# Allegro board 887904-1109-1.brd
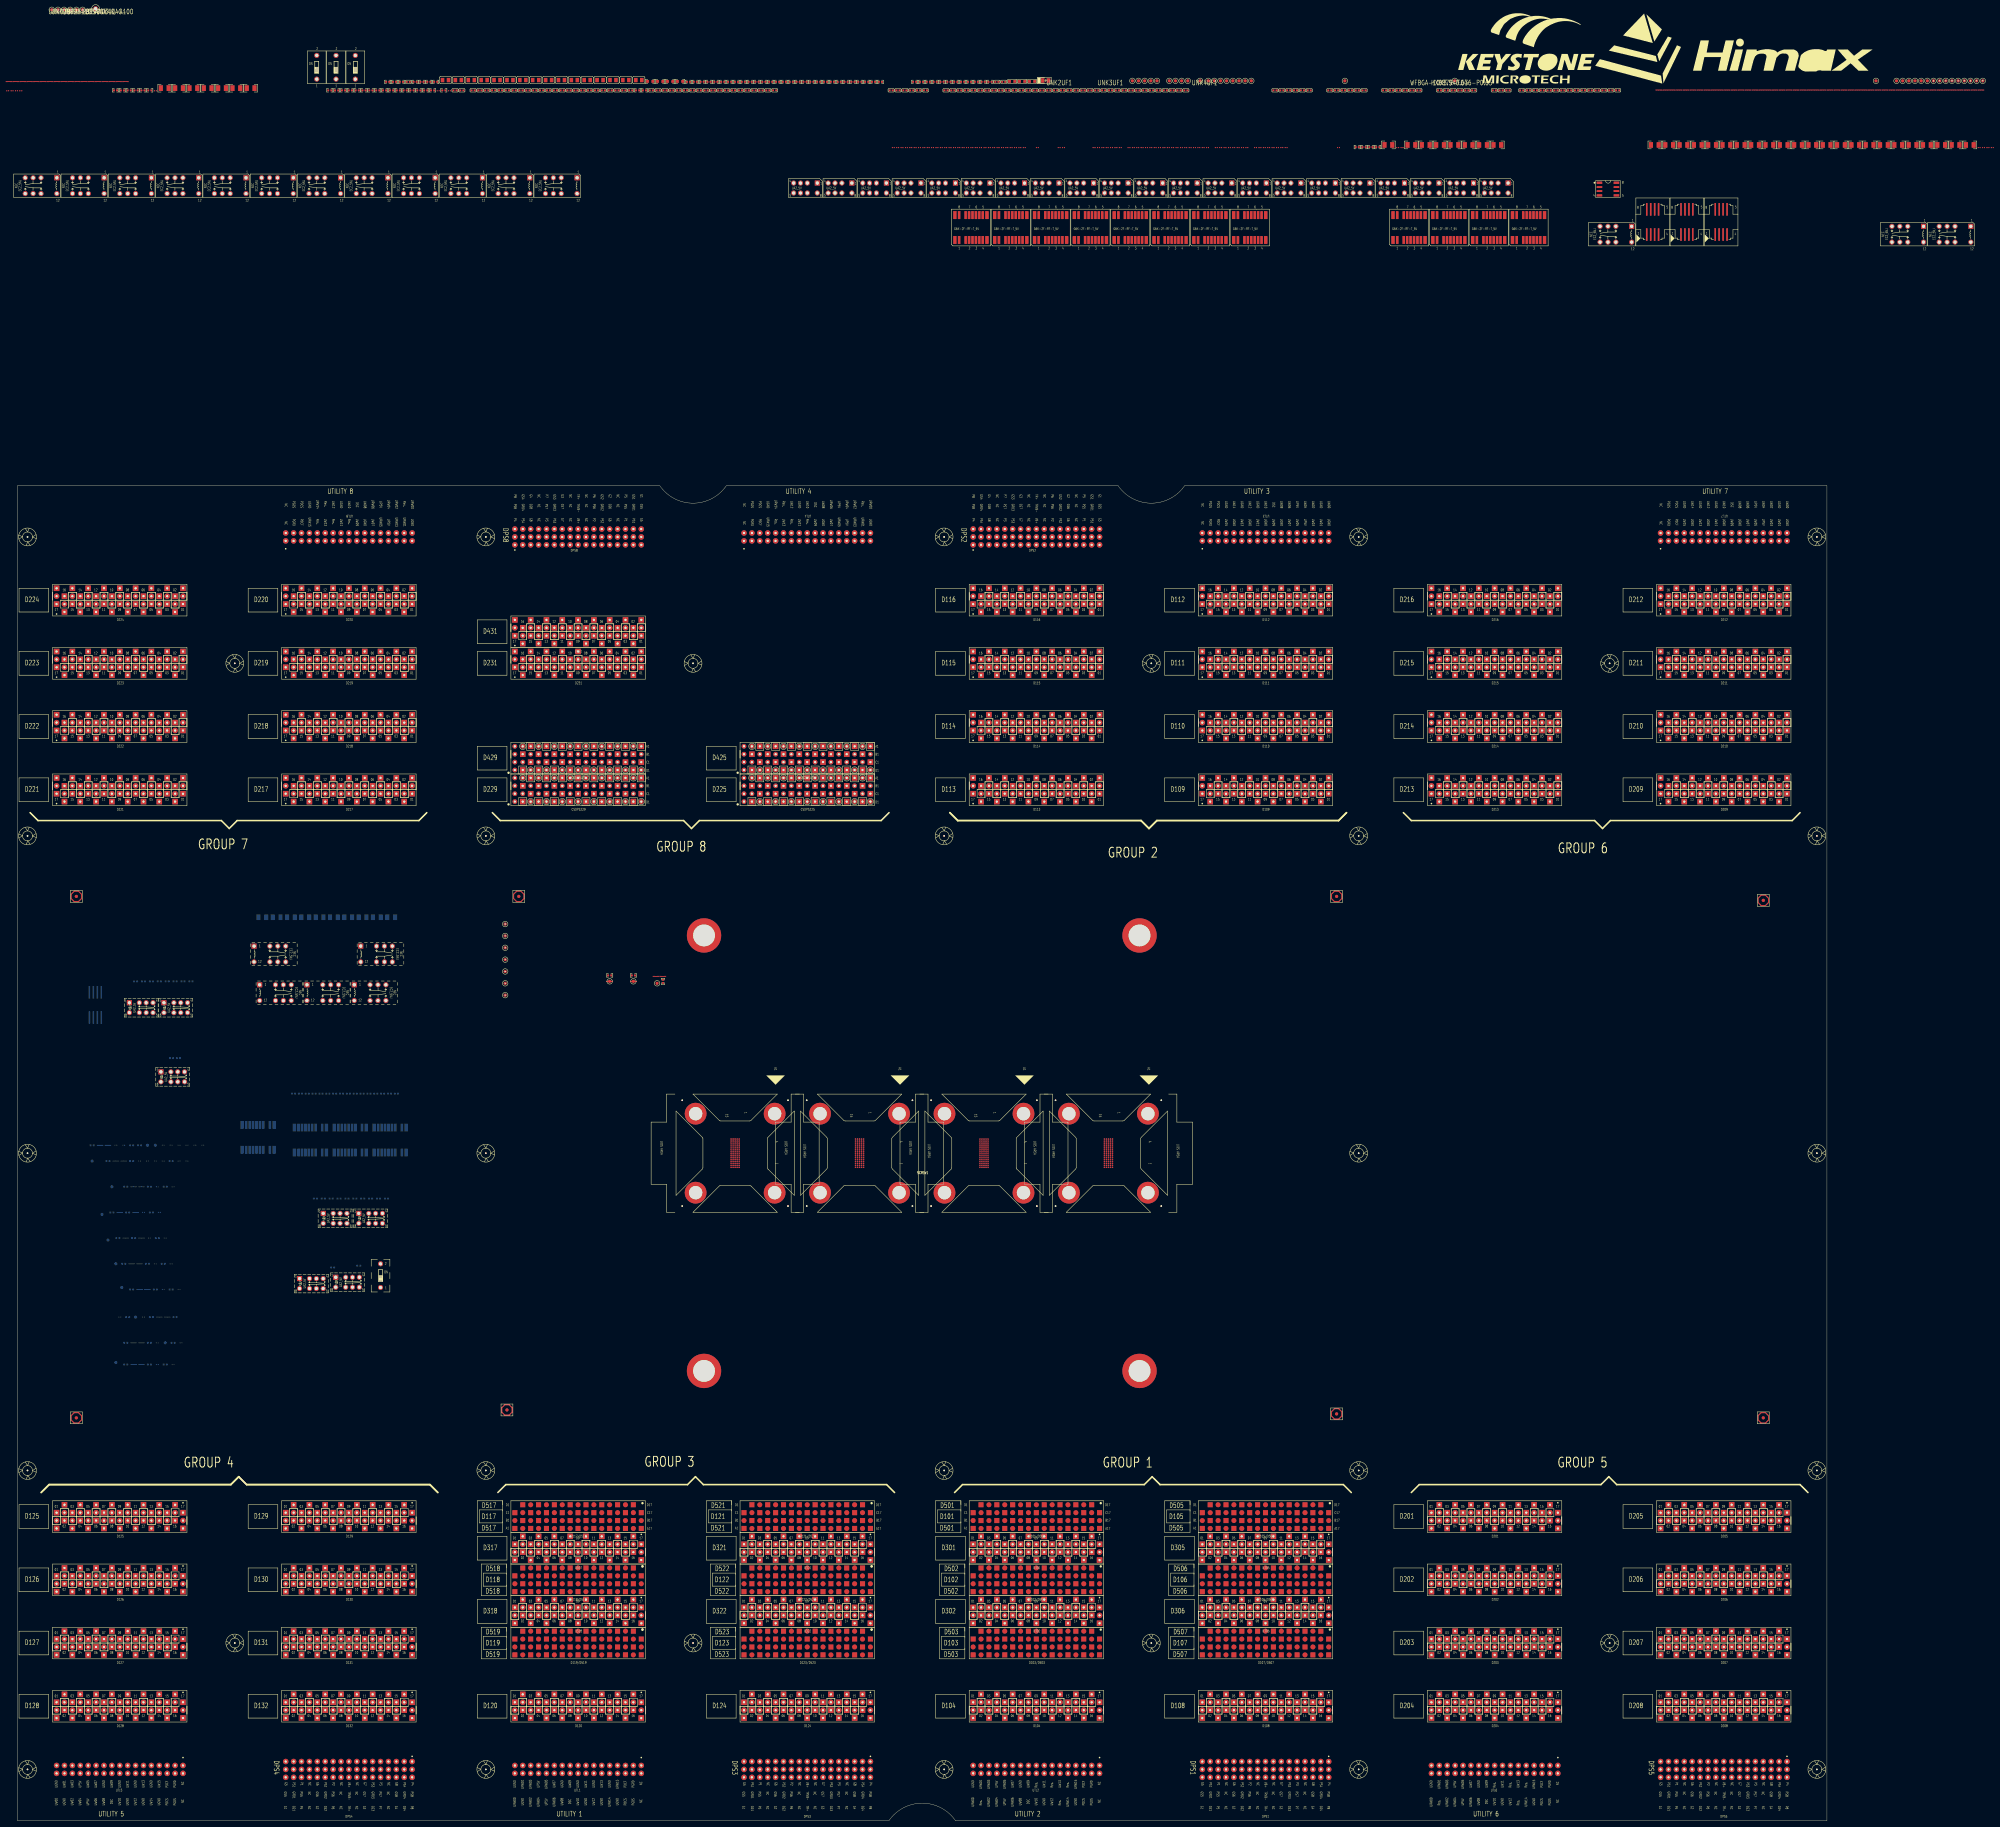
[diagram p0: board, top side]
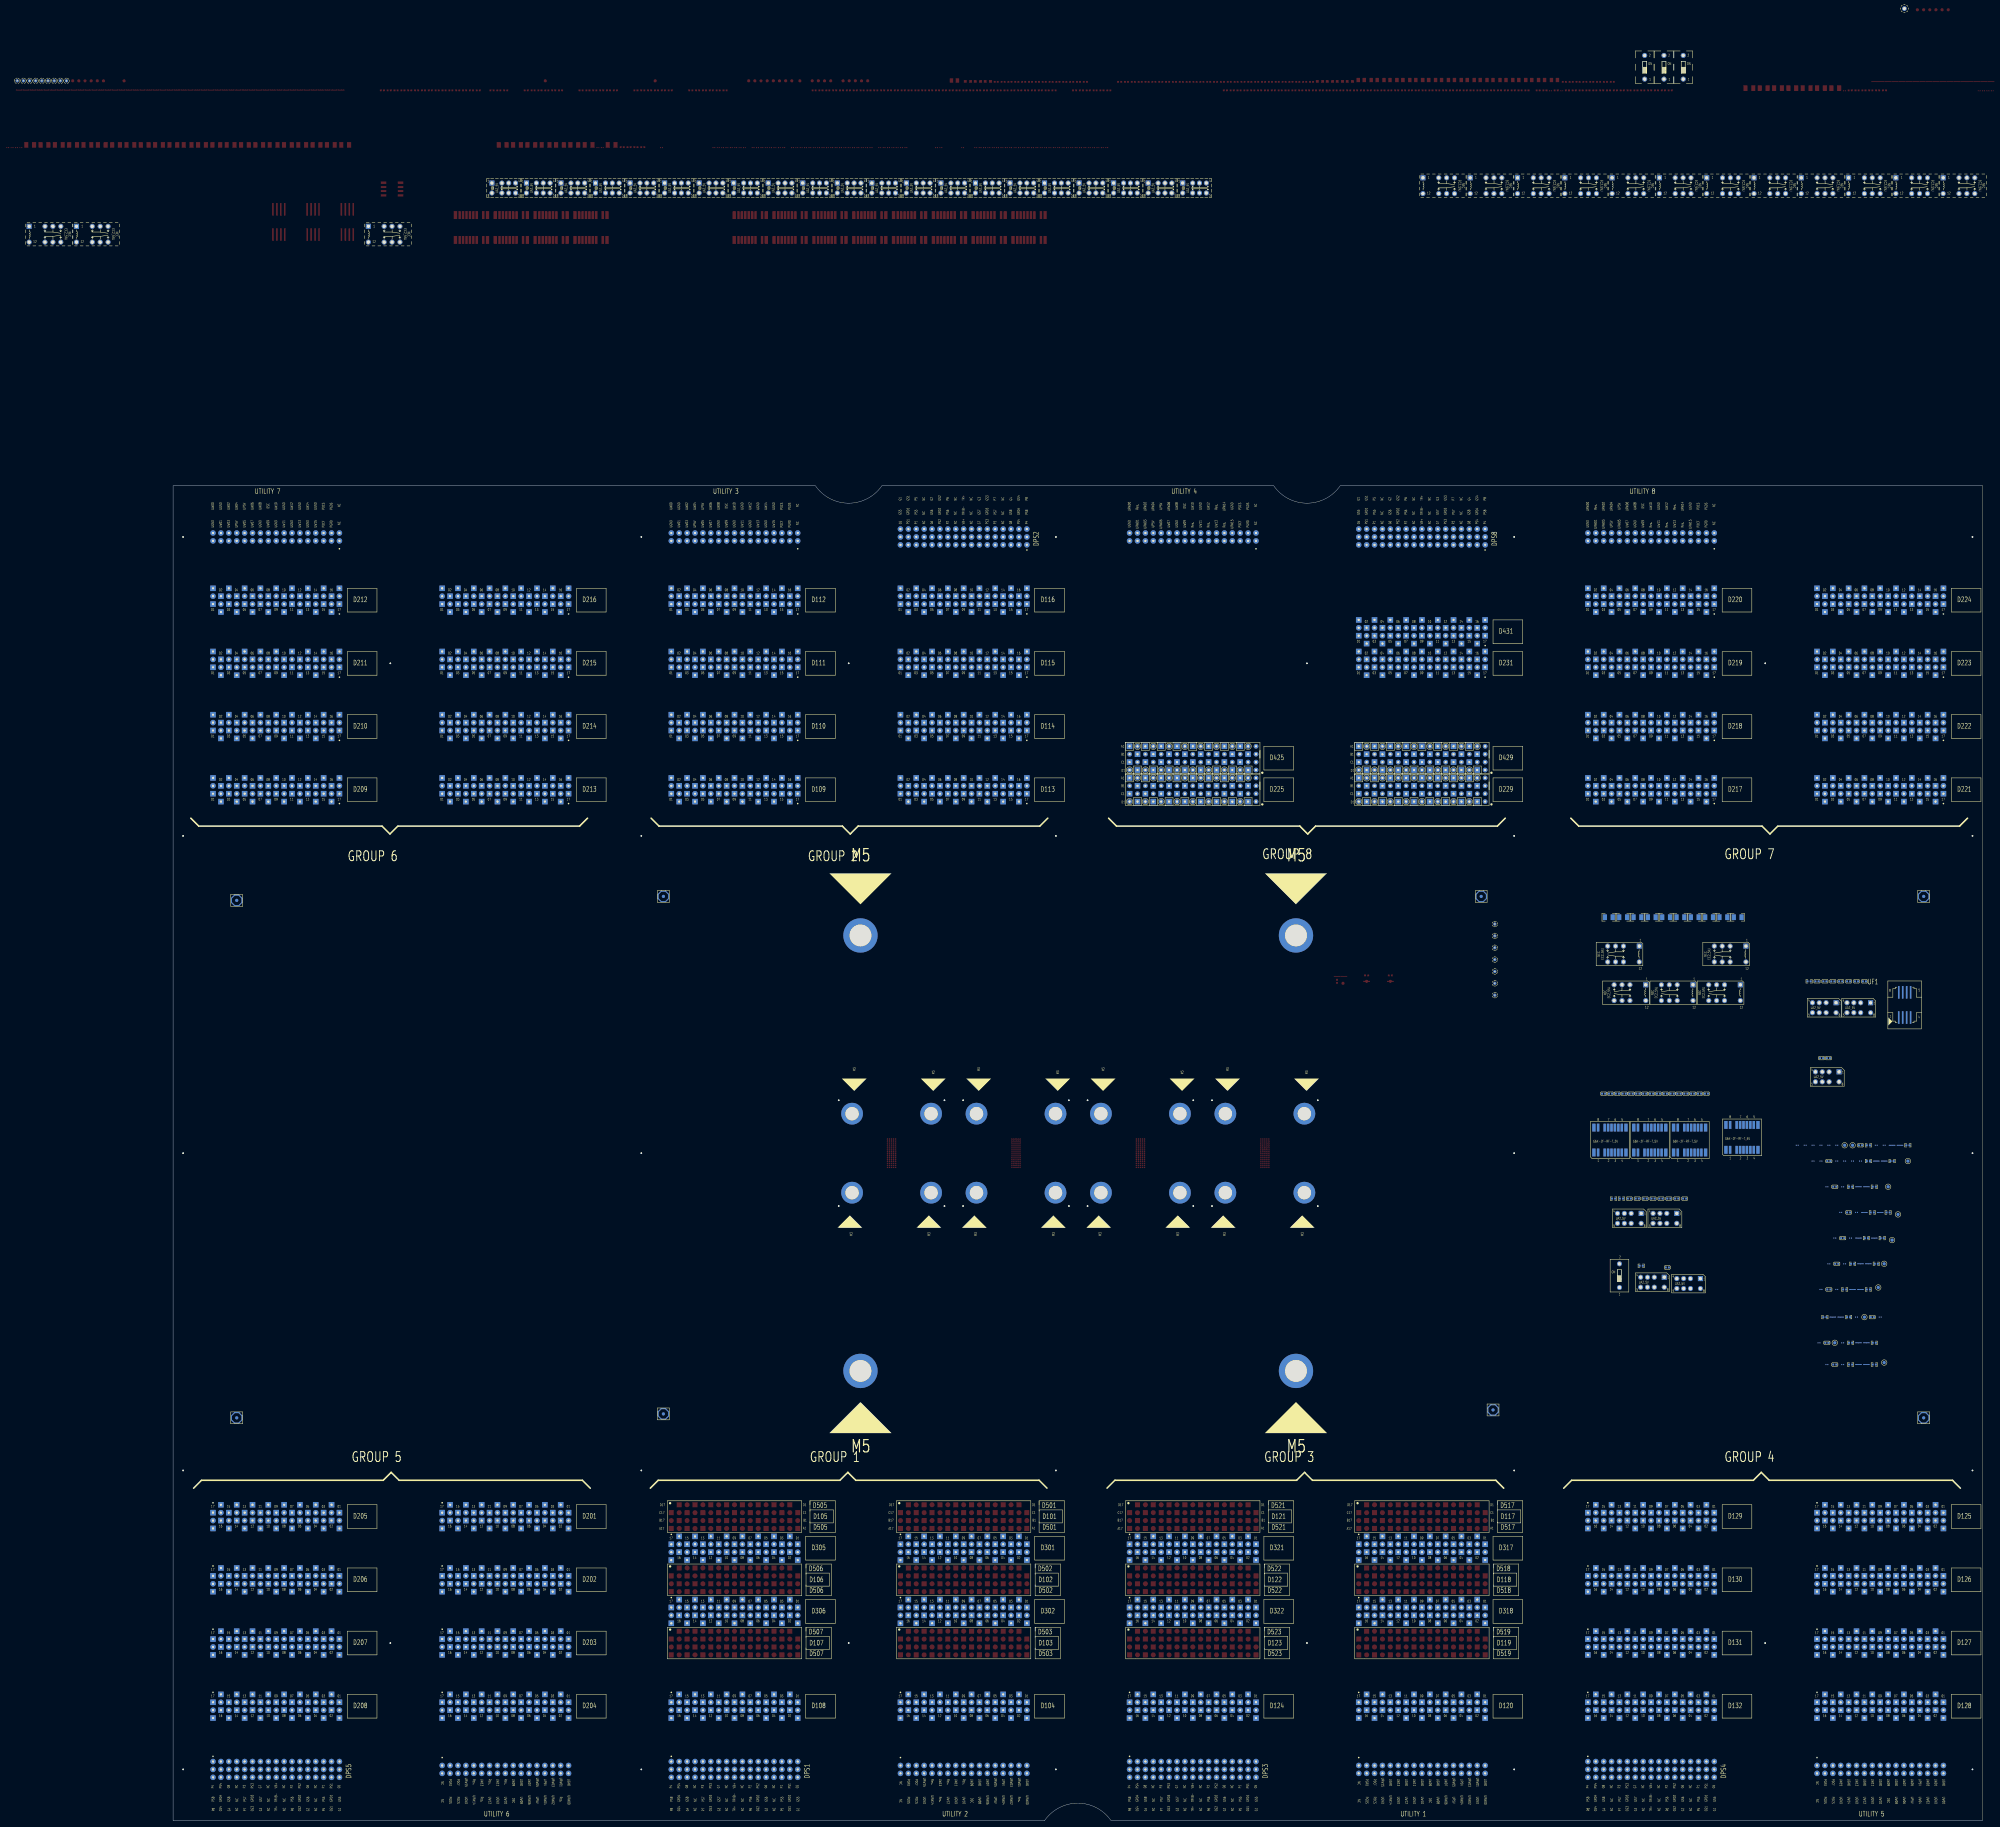
[diagram p1: board, bottom side, seen from below]

Outline 581.66 x 429.26 mm; copper layers: TOP, L02_GND, L03_SIGNAL, L04_GND, L05_SIGNAL, L06_GND, L07_SIGNAL, L08_GND, L09_POWER, L10_GND, L11_POWER, L12_GND, L13_POWER, L14_GND, L15_POWER, L16_GND, L17_POWER, L18_GND, L19_POWER, L20_GND, L21_POWER, L22_GND, L23_POWER, L24_GND, L25_5V, L26_CBIT, L27_GND, L28_SIGNAL, L29_GND, L30_SIGNAL, L31_GND, L32_SIGNAL, L33_GND, BOTTOM. Coordinates in mm from the lower left corner of the outline.

## Placement (name value [footprint] x y rotation side)
BD29  BD120-3A-S8  [FB0805]  137.61 559.64 0 top
BD30  BD120-3A-S8  [FB0805]  141.75 559.64 0 top
BD31  BD120-3A-S8  [FB0805]  145.89 559.64 0 top
BD32  BD120-3A-S8  [FB0805]  150.03 559.64 0 top
BD33  BD120-3A-S8  [FB0805]  154.17 559.64 0 top
BD34  BD120-3A-S8  [FB0805]  158.31 559.64 0 top
BD35  BD120-3A-S8  [FB0805]  162.45 559.64 0 top
BD36  BD120-3A-S8  [FB0805]  166.59 559.64 0 top
BD37  BD120-3A-S8  [FB0805]  170.73 559.64 0 top
BD38  BD120-3A-S8  [FB0805]  174.87 559.64 0 top
BD39  BD120-3A-S8  [FB0805]  179.01 559.64 0 top
BD40  BD120-3A-S8  [FB0805]  183.15 559.64 0 top
BD41  BD120-3A-S8  [FB0805]  187.29 559.64 0 top
BD42  BD120-3A-S8  [FB0805]  191.43 559.64 0 top
BD43  BD120-3A-S8  [FB0805]  195.57 559.64 0 top
BD44  BD120-3A-S8  [FB0805]  199.71 559.64 0 top
C1  0.1U-16-X-S4-MU  [C0402]  55.75 269.88 180 bottom
C53  0.1U-16-X-S4-MU  [C0402]  116.07 200.03 180 bottom
C54  0.1U-16-X-S4-MU  [C0402]  118.61 200.03 180 bottom
C55  0.1U-16-X-S4-MU  [C0402]  109.72 178.44 180 bottom
C67  1U-10-X-S4-MU  [C0402]  36.7 217.17 180 bottom
C69  10U-25-X7R-SA  [C1206]  78.7 290.49 180 bottom
C70  10U-25-X7R-SA  [C1206]  83.3 290.49 180 bottom
C71  1U-10-X-S4-MU  [C0402]  36.7 212.09 180 bottom
C73  1U-10-X-S4-MU  [C0402]  42.41 203.84 180 bottom
C75  1U-10-X-S4-MU  [C0402]  35.43 195.58 180 bottom
C77  1U-10-X-S4-MU  [C0402]  37.33 187.32 180 bottom
C79  1U-10-X-S4-MU  [C0402]  41.78 179.07 180 bottom
C81  1U-10-X-S4-MU  [C0402]  44.32 170.81 180 bottom
C83  1U-10-X-S4-MU  [C0402]  43.05 161.93 180 bottom
C85  1U-10-X-S4-MU  [C0402]  42.41 153.67 180 bottom
C87  1U-10-X-S4-MU  [C0402]  42.41 146.69 180 bottom
C89  10U-25-X7R-SA  [C1206]  87.91 290.49 180 bottom
C90  10U-25-X7R-SA  [C1206]  92.51 290.49 180 bottom
C91  10U-25-X7R-SA  [C1206]  97.11 290.49 180 bottom
C92  10U-25-X7R-SA  [C1206]  101.72 290.49 180 bottom
C93  10U-25-X7R-SA  [C1206]  106.32 290.49 180 bottom
C94  10U-25-X7R-SA  [C1206]  110.92 290.49 180 bottom
C95  10U-25-X7R-SA  [C1206]  115.53 290.49 180 bottom
C96  10U-25-X7R-SA  [C1206]  120.13 290.49 180 bottom
CA1  NC/2.2U-10-X-S4-MU  [C0402]  24 217.17 180 bottom
CA2  NC/2.2U-10-X-S4-MU  [C0402]  29.08 212.09 180 bottom
CA3  NC/2.2U-10-X-S4-MU  [C0402]  34.79 203.84 180 bottom
CA4  NC/2.2U-10-X-S4-MU  [C0402]  30.35 195.58 180 bottom
CA5  NC/2.2U-10-X-S4-MU  [C0402]  32.25 187.32 180 bottom
CA6  NC/2.2U-10-X-S4-MU  [C0402]  34.16 179.07 180 bottom
CA7  NC/2.2U-10-X-S4-MU  [C0402]  36.7 170.81 180 bottom
CA8  NC/2.2U-10-X-S4-MU  [C0402]  50.67 161.93 180 bottom
CA9  NC/2.2U-10-X-S4-MU  [C0402]  34.79 153.67 180 bottom
CA10  NC/2.2U-10-X-S4-MU  [C0402]  34.79 146.69 180 bottom
CA12  NC/2.2U-10-X-S4-MU  [C0402]  207.51 269.88 90 top
CA13  NC/2.2U-10-X-S4-MU  [C0402]  190.37 271.78 0 top
CA14  NC/2.2U-10-X-S4-MU  [C0402]  197.99 271.78 0 top
CB1  0.1U-16-X-S4-MU  [C0402]  277.38 559.05 0 top
CB2  10U-25-X7R-SA  [C1206]  457.3 538.78 0 top
CB3  0.1U-16-X-S4-MU  [C0402]  272.98 559.05 0 top
CB4  10U-25-X7R-SA  [C1206]  452.7 538.78 0 top
CB5  0.1U-16-X-S4-MU  [C0402]  270.77 559.05 0 top
CB6  10U-25-X7R-SA  [C1206]  448.09 538.78 0 top
CB7  0.1U-16-X-S4-MU  [C0402]  268.57 559.05 0 top
CB8  10U-25-X7R-SA  [C1206]  440.68 538.78 0 top
CB9  0.1U-25-X-S6  [C0603]  212.99 559.2 0 top
CB10  10U-25-X7R-SA  [C1206]  475.71 538.78 0 top
CB11  0.1U-25-X-S6  [C0603]  203.38 559.2 0 top
CB12  10U-25-X7R-SA  [C1206]  471.11 538.78 0 top
CB13  0.1U-25-X-S6  [C0603]  206.58 559.2 0 top
CB14  10U-25-X7R-SA  [C1206]  466.5 538.78 0 top
CB15  0.1U-25-X-S6  [C0603]  209.79 559.2 0 top
CB16  10U-25-X7R-SA  [C1206]  461.9 538.78 0 top
CB19  0.1U-16-X-S4-MU  [C0402]  275.18 559.05 0 top
CC1  0.47U-10-X6S-S2-TY  [C0201]  31.62 217.17 180 bottom
CC2  0.47U-10-X6S-S2-TY  [C0201]  46.86 217.17 180 bottom
CC3  0.47U-10-X6S-S2-TY  [C0201]  49.4 217.17 180 bottom
CC4  0.47U-10-X6S-S2-TY  [C0201]  34.16 217.17 180 bottom
CC5  0.47U-10-X6S-S2-TY  [C0201]  46.86 212.09 180 bottom
CC6  0.47U-10-X6S-S2-TY  [C0201]  41.78 212.09 180 bottom
CC7  0.47U-10-X6S-S2-TY  [C0201]  44.32 212.09 180 bottom
CC8  0.47U-10-X6S-S2-TY  [C0201]  44.95 203.84 180 bottom
CC9  0.47U-10-X6S-S2-TY  [C0201]  40.51 195.58 180 bottom
CC10  0.47U-10-X6S-S2-TY  [C0201]  42.41 187.32 180 bottom
CC11  0.47U-10-X6S-S2-TY  [C0201]  44.32 179.07 180 bottom
CC12  0.47U-10-X6S-S2-TY  [C0201]  46.86 170.81 180 bottom
CC13  0.47U-10-X6S-S2-TY  [C0201]  40.51 161.93 180 bottom
CC14  0.47U-10-X6S-S2-TY  [C0201]  44.95 153.67 180 bottom
CC15  0.47U-10-X6S-S2-TY  [C0201]  44.95 146.69 180 bottom
CD1  0.1U-10-X7R-S2-MU  [C0201]  51.94 217.17 180 bottom
CD2  0.1U-10-X7R-S2-MU  [C0201]  54.48 217.17 180 bottom
CD3  0.1U-10-X7R-S2-MU  [C0201]  57.02 217.17 180 bottom
CD4  0.1U-10-X7R-S2-MU  [C0201]  59.56 217.17 180 bottom
CD5  0.1U-10-X7R-S2-MU  [C0201]  51.94 212.09 180 bottom
CD6  0.1U-10-X7R-S2-MU  [C0201]  39.24 212.09 180 bottom
CD7  0.1U-10-X7R-S2-MU  [C0201]  54.48 212.09 180 bottom
CD8  0.1U-10-X7R-S2-MU  [C0201]  50.03 203.84 180 bottom
CD9  0.1U-10-X7R-S2-MU  [C0201]  45.59 195.58 180 bottom
CD10  0.1U-10-X7R-S2-MU  [C0201]  47.49 187.32 180 bottom
CD11  0.1U-10-X7R-S2-MU  [C0201]  49.4 179.07 180 bottom
CD12  0.1U-10-X7R-S2-MU  [C0201]  51.94 170.81 180 bottom
CD13  0.1U-10-X7R-S2-MU  [C0201]  32.89 161.93 180 bottom
CD14  0.1U-10-X7R-S2-MU  [C0201]  52.57 153.67 180 bottom
CD15  0.1U-10-X7R-S2-MU  [C0201]  50.03 146.69 180 bottom
CSDPS225  V93K_CSDPS_DPS32  [PG_VG93K_PF_DPS32_G8D225]  253.87 331.47 0 top
CSDPS229  V93K_CSDPS_DPS32  [PG_VG93K_PF_DPS32_G8D229]  180.21 331.47 0 top
CSDPS425  V93K_CSDPS_DPS32  [PG_VG93K_PF_DPS32_G8D425]  253.87 341.63 0 top
CSDPS429  V93K_CSDPS_DPS32  [PG_VG93K_PF_DPS32_G8D429]  180.21 341.63 0 top
D101/D501  V93K_PS1600 HD  [PG_VG93K_F_HSM_G1D101_501_ND]  327.53 97.79 0 top
D102/D502  V93K_PS1600 HD  [PG_VG93K_F_HSM_G1D102_502_ND]  327.53 77.47 0 top
D103/D503  V93K_PS1600 HD  [PG_VG93K_F_HSM_G1D103_503_ND]  327.53 57.15 0 top
D104  V93K_CH  [PG_VG93K_F_G1D104]  327.53 36.83 0 top
D105/D505  V93K_PS1600 HD  [PG_VG93K_F_HSM_G1D105_505_ND]  401.19 97.79 0 top
D106/D506  V93K_PS1600 HD  [PG_VG93K_F_HSM_G1D106_506_ND]  401.19 77.47 0 top
D107/D507  V93K_PS1600 HD  [PG_VG93K_F_HSM_G1D107_507_ND]  401.19 57.15 0 top
D108  V93K_CH  [PG_VG93K_F_G1D108]  401.19 36.83 0 top
D109  V93K_CH  [PG_VG93K_F_G2D109]  401.19 331.47 0 top
D110  V93K_CH  [PG_VG93K_F_G2D110]  401.19 351.79 0 top
D111  V93K_CH  [PG_VG93K_F_G2D111]  401.19 372.11 0 top
D112  V93K_CH  [PG_VG93K_F_G2D112]  401.19 392.43 0 top
D113  V93K_CH  [PG_VG93K_F_G2D113]  327.53 331.47 0 top
D114  V93K_CH  [PG_VG93K_F_G2D114]  327.53 351.79 0 top
D115  V93K_CH  [PG_VG93K_F_G2D115]  327.53 372.11 0 top
D116  V93K_CH  [PG_VG93K_F_G2D116]  327.53 392.43 0 top
D117/D517  V93K_PS1600 HD  [PG_VG93K_F_HSM_G3D117_517_ND]  180.21 97.79 0 top
D118/D518  V93K_PS1600 HD  [PG_VG93K_F_HSM_G3D118_518_ND]  180.21 77.47 0 top
D119/D519  V93K_PS1600 HD  [PG_VG93K_F_HSM_G3D119_519_ND]  180.21 57.15 0 top
D120  V93K_CH  [PG_VG93K_F_G3D120]  180.21 36.83 0 top
D121/D521  V93K_PS1600 HD  [PG_VG93K_F_HSM_G3D121_521_ND]  253.87 97.79 0 top
D122/D522  V93K_PS1600 HD  [PG_VG93K_F_HSM_G3D122_522_ND]  253.87 77.47 0 top
D123/D523  V93K_PS1600 HD  [PG_VG93K_F_HSM_G3D123_523_ND]  253.87 57.15 0 top
D124  V93K_CH  [PG_VG93K_F_G3D124]  253.87 36.83 0 top
D125  V93K_CH  [PG_VG93K_F_G4D125]  32.89 97.79 0 top
D126  V93K_CH  [PG_VG93K_F_G4D126]  32.89 77.47 0 top
D127  V93K_CH  [PG_VG93K_F_G4D127]  32.89 57.15 0 top
D128  V93K_CH  [PG_VG93K_F_G4D128]  32.89 36.83 0 top
D129  V93K_CH  [PG_VG93K_F_G4D129]  106.55 97.79 0 top
D130  V93K_CH  [PG_VG93K_F_G4D130]  106.55 77.47 0 top
D131  V93K_CH  [PG_VG93K_F_G4D131]  106.55 57.15 0 top
D132  V93K_CH  [PG_VG93K_F_G4D132]  106.55 36.83 0 top
D201  V93K_CH  [PG_VG93K_F_G5D201]  474.85 97.79 0 top
D202  V93K_CH  [PG_VG93K_F_G5D202]  474.85 77.47 0 top
D203  V93K_CH  [PG_VG93K_F_G5D203]  474.85 57.15 0 top
D204  V93K_CH  [PG_VG93K_F_G5D204]  474.85 36.83 0 top
D205  V93K_CH  [PG_VG93K_F_G5D205]  548.51 97.79 0 top
D206  V93K_CH  [PG_VG93K_F_G5D206]  548.51 77.47 0 top
D207  V93K_CH  [PG_VG93K_F_G5D207]  548.51 57.15 0 top
D208  V93K_CH  [PG_VG93K_F_G5D208]  548.51 36.83 0 top
D209  V93K_CH  [PG_VG93K_F_G6D209]  548.51 331.47 0 top
D210  V93K_CH  [PG_VG93K_F_G6D210]  548.51 351.79 0 top
D211  V93K_CH  [PG_VG93K_F_G6D211]  548.51 372.11 0 top
D212  V93K_CH  [PG_VG93K_F_G6D212]  548.51 392.43 0 top
D213  V93K_CH  [PG_VG93K_F_G6D213]  474.85 331.47 0 top
D214  V93K_CH  [PG_VG93K_F_G6D214]  474.85 351.79 0 top
D215  V93K_CH  [PG_VG93K_F_G6D215]  474.85 372.11 0 top
D216  V93K_CH  [PG_VG93K_F_G6D216]  474.85 392.43 0 top
D217  V93K_CH  [PG_VG93K_F_G7D217]  106.55 331.47 0 top
D218  V93K_CH  [PG_VG93K_F_G7D218]  106.55 351.79 0 top
D219  V93K_CH  [PG_VG93K_F_G7D219]  106.55 372.11 0 top
D220  V93K_CH  [PG_VG93K_F_G7D220]  106.55 392.43 0 top
D221  V93K_CH  [PG_VG93K_F_G7D221]  32.89 331.47 0 top
D222  V93K_CH  [PG_VG93K_F_G7D222]  32.89 351.79 0 top
D223  V93K_CH  [PG_VG93K_F_G7D223]  32.89 372.11 0 top
D224  V93K_CH  [PG_VG93K_F_G7D224]  32.89 392.43 0 top
D231  V93K_CH  [PG_VG93K_F_G8D231]  180.21 372.11 0 top
D301  V93K_CH  [PG_VG93K_F_G1D301]  327.53 87.63 0 top
D302  V93K_CH  [PG_VG93K_F_G1D302]  327.53 67.31 0 top
D305  V93K_CH  [PG_VG93K_F_G1D305]  401.19 87.63 0 top
D306  V93K_CH  [PG_VG93K_F_G1D306]  401.19 67.31 0 top
D317  V93K_CH  [PG_VG93K_F_G3D317]  180.21 87.63 0 top
D318  V93K_CH  [PG_VG93K_F_G3D318]  180.21 67.31 0 top
D321  V93K_CH  [PG_VG93K_F_G3D321]  253.87 87.63 0 top
D322  V93K_CH  [PG_VG93K_F_G3D322]  253.87 67.31 0 top
D431  V93K_CH  [PG_VG93K_F_G8D431]  180.21 382.27 0 top
DPS1  V93K_DPS  [PG_VG93K_F_G1DPS1]  401.19 16.51 0 top
DPS2  V93K_DPS  [PG_VG93K_F_G2DPS2]  327.53 412.75 0 top
DPS3  V93K_DPS  [PG_VG93K_F_G3DPS3]  253.87 16.51 0 top
DPS4  V93K_DPS  [PG_VG93K_F_G4DPS4]  106.55 16.51 0 top
DPS5  V93K_DPS  [PG_VG93K_F_G5DPS5]  548.51 16.51 0 top
DPS8  V93K_DPS  [PG_VG93K_F_G8DPS8]  180.21 412.75 0 top
FD1  -  [FD_040_V2]  157.35 132.08 0 top
FD2  -  [FD_040_V2]  424.05 130.81 0 top
FD3  -  [FD_040_V2]  424.05 297.18 0 top
FD4  -  [FD_040_V2]  161.16 297.18 0 top
FD5  -  [FD_040_V2]  18.92 129.54 0 top
FD6  -  [FD_040_V2]  561.21 129.54 0 top
FD7  -  [FD_040_V2]  561.21 295.91 0 top
FD8  -  [FD_040_V2]  18.92 297.18 0 top
FD9  -  [FD_040_V2]  157.35 132.08 180 bottom
FD10  -  [FD_040_V2]  424.05 130.81 180 bottom
FD11  -  [FD_040_V2]  424.05 297.18 180 bottom
FD12  -  [FD_040_V2]  161.16 297.18 180 bottom
FD13  -  [FD_040_V2]  18.92 129.54 180 bottom
FD14  -  [FD_040_V2]  561.21 129.54 180 bottom
FD15  -  [FD_040_V2]  561.21 295.91 180 bottom
FD16  -  [FD_040_V2]  18.92 297.18 180 bottom
GND1  TP01  [TP_040_T]  41.78 217.17 180 bottom
HX8879-F04  REF-CODE-CHIP  [CHIP_CODE]  460.09 558.9 0 top
K9  UA2-5NJ-A-V3  [RL_NECUA2_5V_V3]  113.33 193.68 180 bottom
K10  UA2-5NJ-A-V3  [RL_NECUA2_5V_V3]  94.28 172.72 180 bottom
K14  UA2-5NJ-A-V3  [RL_NECUA2_5V_V3]  39.57 261.4 180 bottom
K15  UA2-5NJ-A-V3  [RL_NECUA2_5V_V3]  50.68 261.4 180 bottom
K28  UA2-5NJ-A-V3  [RL_NECUA2_5V_V3]  49.72 239.18 180 bottom
K48  UA2-5NJ-A-V3  [RL_NECUA2_5V_V3]  105.9 173.14 180 bottom
K50  UA2-5NJ-A-V3  [RL_NECUA2_5V_V3]  101.9 193.68 180 bottom
K54  G6K-2F-RF-T-5V-SPECIAL  [RL_G6K2FRT_8P_5V_GR]  77.39 219.71 180 bottom
K55  EC2-5NJ-A  [RL_NECEC2_10P_5V]  84.21 266.23 180 bottom
K56  EC2-5NJ-A  [RL_NECEC2_10P_5V]  99.41 266.23 180 bottom
K57  EC2-5NJ-A  [RL_NECEC2_10P_5V]  114.61 266.23 180 bottom
K58  EC2-5NJ-A  [RL_NECEC2_10P_5V]  82.41 278.66 180 bottom
K59  EC2-5NJ-A  [RL_NECEC2_10P_5V]  116.69 278.66 180 bottom
K60  G6K-2F-RF-T-5V-SPECIAL  [RL_G6K2FRT_8P_5V_GR]  119.82 218.85 180 bottom
K61  G6K-2F-RF-T-5V-SPECIAL  [RL_G6K2FRT_8P_5V_GR]  107.01 218.85 180 bottom
K62  G6K-2F-RF-T-5V-SPECIAL  [RL_G6K2FRT_8P_5V_GR]  94.21 218.85 180 bottom
LDB1  LDB-2-S8  [LED_0805]  330.49 559.5 0 top
LOGO1  -  [LOGO_KT_KSMT]  481.96 562.84 0 top
LOGO2  LOGO_HX_Himax  [LOGO_HX_HIMAX]  550.3 564.49 0 top
LRB1  330-1-S6  [R0603]  319.75 559.2 0 top
NOREF  -  []  102.24 215.4 90 top
NOREF#2  -  []  342.73 526.53 0 top
NOREF#3  -  []  282.82 526.53 0 top
NOREF#4  -  []  48.8 179.39 0 top
NOREF#5  -  []  43.72 178.75 90 top
NOREF#6  -  []  475.97 526.53 0 top
NOREF#7  -  []  48.88 263 0 top
NOREF#8  -  []  44.65 146.69 0 top
NOREF#9  -  []  375.25 537.94 0 top
NOREF#10  -  []  46.26 170.49 90 top
NOREF#11  -  []  438.26 526.53 0 top
NOREF#12  -  []  298 227.33 0 top
NOREF#13  -  []  247.7 197.63 90 top
NOREF#14  -  []  343.2 516.22 0 top
NOREF#15  -  []  293.7 231.63 0 top
NOREF#16  -  []  394.89 537.94 0 top
NOREF#17  -  []  449.36 526.53 0 top
NOREF#18  -  []  138.55 556.2 0 top
NOREF#19  -  []  111.11 214.9 90 top
NOREF#20  -  []  386.17 538.26 0 top
NOREF#21  -  []  46.26 211.77 90 top
NOREF#22  -  []  251.7 233.63 0 top
NOREF#23  -  []  114.17 216.12 90 top
NOREF#24  -  []  279.31 526.53 0 top
NOREF#25  -  []  318.62 537.62 90 top
NOREF#26  -  []  59.26 217.17 0 top
NOREF#27  -  []  25.65 266.34 0 top
NOREF#28  -  []  53.72 240.78 0 top
NOREF#29  -  []  260.61 526.53 0 top
NOREF#30  -  []  301.52 526.53 0 top
NOREF#31  -  []  106.3 174.74 0 top
NOREF#32  -  []  56.72 217.17 0 top
NOREF#33  -  []  44.47 236.18 90 top
NOREF#34  -  []  52.27 153.67 0 top
NOREF#35  -  []  44.35 153.35 90 top
NOREF#36  -  []  42.11 187.32 0 top
NOREF#37  -  []  542.05 511.52 90 top
NOREF#38  -  []  404.95 526.53 0 top
NOREF#39  -  []  43.73 556.52 0 top
NOREF#40  -  []  465.71 507.77 90 top
NOREF#41  -  []  380.36 537.62 90 top
NOREF#42  -  []  106.46 214.85 0 top
NOREF#43  -  []  367.73 537.62 90 top
NOREF#44  -  []  351.64 526.53 0 top
NOREF#45  -  []  403.3 527.93 0 top
NOREF#46  -  []  340.7 217.09 90 top
NOREF#47  -  []  307 508.22 0 top
NOREF#48  -  []  523.74 509.97 90 top
NOREF#49  -  []  481.94 516.22 0 top
NOREF#50  -  []  371.94 537.62 90 top
NOREF#51  -  []  466.64 518.12 0 top
NOREF#52  -  []  460.47 526.53 0 top
NOREF#53  -  []  634.22 538.26 0 top
NOREF#54  -  []  387.58 538.26 0 top
NOREF#55  -  []  323.04 538.26 0 top
NOREF#56  -  []  369.79 521.93 90 top
NOREF#57  -  []  376.35 538.26 0 top
NOREF#58  -  []  51.64 170.81 0 top
NOREF#59  -  []  75.74 223.71 0 top
NOREF#60  -  []  301.35 508.22 0 top
NOREF#61  -  []  379.24 523.33 90 top
NOREF#62  -  []  350.89 537.62 90 top
NOREF#63  -  []  89.01 222.85 0 top
NOREF#64  -  []  54.18 217.17 0 top
NOREF#65  -  []  119.27 214.85 0 top
NOREF#66  -  []  103.16 222.85 0 top
NOREF#67  -  []  -2.04 556.2 0 top
NOREF#68  -  []  289.16 537.62 90 top
NOREF#69  -  []  49.73 146.69 0 top
NOREF#70  -  []  71.04 225.61 0 top
NOREF#71  -  []  458.43 516.22 0 top
NOREF#72  -  []  374.75 537.62 90 top
NOREF#73  -  []  348.59 537.94 0 top
NOREF#74  -  []  553.06 511.52 90 top
NOREF#75  -  []  311.14 196.91 90 top
NOREF#76  -  []  328.44 537.62 90 top
NOREF#77  -  []  293.87 537.94 0 top
NOREF#78  -  []  352.8 537.94 0 top
NOREF#79  -  []  339.21 509.49 90 top
NOREF#80  -  []  91.46 214.85 0 top
NOREF#81  -  []  447.51 521.93 90 top
NOREF#82  -  []  361.22 537.94 0 top
NOREF#83  -  []  38.64 211.77 90 top
NOREF#84  -  []  379.46 537.94 0 top
NOREF#85  -  []  107.56 222.85 0 top
NOREF#86  -  []  33.56 217.49 0 top
NOREF#87  -  []  393.49 537.94 0 top
NOREF#88  -  []  243.7 204.63 90 top
NOREF#89  -  []  345.93 526.53 0 top
NOREF#90  -  []  331.63 526.53 0 top
NOREF#91  -  []  327.23 526.53 0 top
NOREF#92  -  []  444.49 538.26 0 top
NOREF#93  -  []  380.89 521.93 90 top
NOREF#94  -  []  280.96 521.93 90 top
NOREF#95  -  []  390.97 508.22 0 top
NOREF#96  -  []  287.96 538.26 0 top
NOREF#97  -  []  404.21 537.62 90 top
NOREF#98  -  []  352 218.53 90 top
NOREF#99  -  []  418.26 526.53 0 top
NOREF#100  -  []  464.87 526.53 0 top
NOREF#101  -  []  327.86 560.5 0 top
NOREF#102  -  []  336.68 527.93 0 top
NOREF#103  -  []  452.48 508.22 90 top
NOREF#104  -  []  458.82 527.93 0 top
NOREF#105  -  []  401.27 508.22 90 top
NOREF#106  -  []  451.38 508.27 90 top
NOREF#107  -  []  366.53 538.26 0 top
NOREF#108  -  []  290.42 523.33 90 top
NOREF#109  -  []  332.7 195.63 90 top
NOREF#110  -  []  326.41 509.49 90 top
NOREF#111  -  []  92.56 222.85 0 top
NOREF#112  -  []  345.4 508.22 0 top
NOREF#113  -  []  279.31 523.33 90 top
NOREF#114  -  []  366.33 537.62 90 top
NOREF#115  -  []  394.42 516.22 0 top
NOREF#116  -  []  369.99 527.93 0 top
NOREF#117  -  []  443.39 537.94 0 top
NOREF#118  -  []  317.22 537.62 90 top
NOREF#119  -  []  429.36 526.53 0 top
NOREF#120  -  []  349.4 219.18 0 top
NOREF#121  -  []  374.56 508.27 90 top
NOREF#122  -  []  397.4 538.26 0 top
NOREF#123  -  []  358.41 537.94 0 top
NOREF#124  -  []  -2.54 555.88 90 top
NOREF#125  -  []  44.35 204.16 0 top
NOREF#126  -  []  533.65 519.72 0 top
NOREF#127  -  []  93.68 567.05 0 top
NOREF#128  -  []  331.7 228.68 45 top
NOREF#129  -  []  304.79 538.26 0 top
NOREF#130  -  []  341.1 516.22 0 top
NOREF#131  -  []  300.8 509.49 90 top
NOREF#132  -  []  431.56 526.53 0 top
NOREF#133  -  []  81.49 215.76 90 top
NOREF#134  -  []  404.41 538.26 0 top
NOREF#135  -  []  312.62 523.33 90 top
NOREF#136  -  []  251.71 526.53 0 top
NOREF#137  -  []  376.09 508.77 90 top
NOREF#138  -  []  452.9 508.77 90 top
NOREF#139  -  []  77.94 223.71 0 top
NOREF#140  -  []  374.31 516.22 0 top
NOREF#141  -  []  423.66 523.33 90 top
NOREF#142  -  []  317.72 537.94 0 top
NOREF#143  -  []  471.24 508.22 0 top
NOREF#144  -  []  307.6 538.26 0 top
NOREF#145  -  []  380.56 538.26 0 top
NOREF#146  -  []  290.76 538.26 0 top
NOREF#147  -  []  283.7 204.63 90 top
NOREF#148  -  []  97.9 195.27 0 top
NOREF#149  -  []  325.8 518.12 0 top
NOREF#150  -  []  329.43 526.53 0 top
NOREF#151  -  []  467.24 509.49 90 top
NOREF#152  -  []  34.32 263.55 0 top
NOREF#153  -  []  318.83 538.26 0 top
NOREF#154  -  []  203.7 204.63 90 top
NOREF#155  -  []  45.43 263.55 0 top
NOREF#156  -  []  202.53 558.75 90 top
NOREF#157  -  []  458.61 521.93 90 top
NOREF#158  -  []  389.61 506.32 90 top
NOREF#159  -  []  272 210.08 90 top
NOREF#160  -  []  317.6 516.22 0 top
NOREF#161  -  []  93.2 569 0 top
NOREF#162  -  []  351.2 506.32 90 top
NOREF#163  -  []  382.75 526.53 0 top
NOREF#164  -  []  381.97 538.26 0 top
NOREF#165  -  []  287.75 537.62 90 top
NOREF#166  -  []  393.85 526.53 0 top
NOREF#167  -  []  41.18 212.41 0 top
NOREF#168  -  []  348.2 279.63 90 top
NOREF#169  -  []  384.77 538.26 0 top
NOREF#170  -  []  302.29 537.94 0 top
NOREF#171  -  []  390.42 509.49 90 top
NOREF#172  -  []  109.33 195.27 0 top
NOREF#173  -  []  44.03 556.2 0 top
NOREF#174  -  []  39.91 162.25 0 top
NOREF#175  -  []  425.31 521.93 90 top
NOREF#176  -  []  296.12 526.53 0 top
NOREF#177  -  []  43.57 263 0 top
NOREF#178  -  []  352.01 509.49 90 top
NOREF#179  -  []  368.23 537.94 0 top
NOREF#180  -  []  323.1 516.22 0 top
NOREF#181  -  []  49.1 179.07 0 top
NOREF#182  -  []  44.35 146.36 90 top
NOREF#183  -  []  102.4 559.94 90 top
NOREF#184  -  []  353.84 526.53 0 top
NOREF#185  -  []  346.89 538.26 0 top
NOREF#186  -  []  523.75 518.07 0 top
NOREF#187  -  []  341.1 516.22 0 top
NOREF#188  -  []  243.7 224.63 0 top
NOREF#189  -  []  312.8 506.32 90 top
NOREF#190  -  []  314.41 537.62 90 top
NOREF#191  -  []  314.48 527.93 0 top
NOREF#192  -  []  402.81 537.62 90 top
NOREF#193  -  []  388.98 538.26 0 top
NOREF#194  -  []  373.55 538.26 0 top
NOREF#195  -  []  401.45 523.33 90 top
NOREF#196  -  []  316.13 526.53 0 top
NOREF#197  -  []  134.64 556.52 0 top
NOREF#198  -  []  282.82 526.53 0 top
NOREF#199  -  []  97.96 214.85 0 top
NOREF#200  -  []  451.56 526.53 0 top
NOREF#201  -  []  458.43 508.22 0 top
NOREF#202  -  []  290.56 537.62 90 top
NOREF#203  -  []  468.07 526.53 0 top
NOREF#204  -  []  353.91 516.22 0 top
NOREF#205  -  []  96.65 195.83 0 top
NOREF#206  -  []  22.02 267.99 0 top
NOREF#207  -  []  283.75 538.26 0 top
NOREF#208  -  []  281.24 537.94 0 top
NOREF#209  -  []  327.54 537.94 0 top
NOREF#210  -  []  373.34 537.62 90 top
NOREF#211  -  []  139.45 555.88 90 top
NOREF#212  -  []  383.17 537.62 90 top
NOREF#213  -  []  39.91 195.9 0 top
NOREF#214  -  []  34.32 263.55 0 top
NOREF#215  -  []  257.11 526.53 0 top
NOREF#216  -  []  49.43 203.51 90 top
NOREF#217  -  []  143.7 321.13 0 top
NOREF#218  -  []  258.96 527.93 0 top
NOREF#219  -  []  311.81 538.26 0 top
NOREF#220  -  []  427.16 526.53 0 top
NOREF#221  -  []  314.27 521.93 90 top
NOREF#222  -  []  484.04 508.22 0 top
NOREF#223  -  []  544.66 519.72 0 top
NOREF#224  -  []  323.73 523.33 90 top
NOREF#225  -  []  387.11 516.22 0 top
NOREF#226  -  []  313.6 509.49 90 top
NOREF#227  -  []  358.69 521.93 90 top
NOREF#228  -  []  325.58 527.93 0 top
NOREF#229  -  []  38.94 212.09 0 top
NOREF#230  -  []  123.57 214.85 0 top
NOREF#231  -  []  21.22 267.49 0 top
NOREF#232  -  []  364.01 506.32 90 top
NOREF#233  -  []  398.25 526.53 0 top
NOREF#234  -  []  469.14 516.22 0 top
NOREF#235  -  []  320.53 526.53 0 top
NOREF#236  -  []  44.35 153.99 0 top
NOREF#237  -  []  476.99 508.27 90 top
NOREF#238  -  []  471.57 526.53 0 top
NOREF#239  -  []  387.88 537.94 0 top
NOREF#240  -  []  99.4 569 0 top
NOREF#241  -  []  51.97 153.35 90 top
NOREF#242  -  []  111.61 558.5 90 top
NOREF#243  -  []  387.36 508.27 90 top
NOREF#244  -  []  460.63 508.22 0 top
NOREF#245  -  []  291.7 233.63 0 top
NOREF#246  -  []  529.45 508.82 90 top
NOREF#247  -  []  220.7 284.63 0 top
NOREF#248  -  []  328.3 516.22 0 top
NOREF#249  -  []  46.26 171.14 0 top
NOREF#250  -  []  125.44 214.4 90 top
NOREF#251  -  []  353.7 537.62 90 top
NOREF#252  -  []  116.93 192.08 90 top
NOREF#253  -  []  51.64 217.17 0 top
NOREF#254  -  []  102.3 195.27 0 top
NOREF#255  -  []  248.7 233.63 0 top
NOREF#256  -  []  314.62 538.26 0 top
NOREF#257  -  []  350.48 508.77 90 top
NOREF#258  -  []  292.17 538.26 0 top
NOREF#259  -  []  99.88 567.05 0 top
NOREF#260  -  []  311.14 234.91 0 top
NOREF#261  -  []  293.37 537.62 90 top
NOREF#262  -  []  375.66 508.22 90 top
NOREF#263  -  []  138.25 556.52 0 top
NOREF#264  -  []  425.51 527.93 0 top
NOREF#265  -  []  262.81 526.53 0 top
NOREF#266  -  []  360.72 537.62 90 top
NOREF#267  -  []  372.44 537.94 0 top
NOREF#268  -  []  282.65 537.94 0 top
NOREF#269  -  []  109.33 195.27 0 top
NOREF#270  -  []  321.43 537.62 90 top
NOREF#271  -  []  258.76 521.93 90 top
NOREF#272  -  []  480.82 521.93 90 top
NOREF#273  -  []  260.61 526.53 0 top
NOREF#274  -  []  363.4 201.93 90 top
NOREF#275  -  []  360.54 526.53 0 top
NOREF#276  -  []  382.75 526.53 0 top
NOREF#277  -  []  308.8 537.62 90 top
NOREF#278  -  []  315.5 516.22 0 top
NOREF#279  -  []  320.03 537.62 90 top
NOREF#280  -  []  257.11 523.33 90 top
NOREF#281  -  []  406.12 537.94 0 top
NOREF#282  -  []  479.44 518.12 0 top
NOREF#283  -  []  45.29 195.58 0 top
NOREF#284  -  []  553.06 506.32 90 top
NOREF#285  -  []  324.45 508.22 90 top
NOREF#286  -  []  49.43 147.01 0 top
NOREF#287  -  []  348.09 537.62 90 top
NOREF#288  -  []  114.62 214.85 90 top
NOREF#289  -  []  407.02 537.62 90 top
NOREF#290  -  []  312 210.08 90 top
NOREF#291  -  []  369.34 538.26 0 top
NOREF#292  -  []  21.22 257.09 90 top
NOREF#293  -  []  323.73 526.53 0 top
NOREF#294  -  []  366.71 516.22 0 top
NOREF#295  -  []  490.89 508.22 90 top
NOREF#296  -  []  51.08 263 0 top
NOREF#297  -  []  390.38 538.26 0 top
NOREF#298  -  []  41.48 212.09 0 top
NOREF#299  -  []  398.8 538.26 0 top
NOREF#300  -  []  319.8 508.22 0 top
NOREF#301  -  []  35.57 263 0 top
NOREF#302  -  []  325.6 506.32 90 top
NOREF#303  -  []  542.26 521.72 0 top
NOREF#304  -  []  46.26 216.85 90 top
NOREF#305  -  []  271.71 526.53 0 top
NOREF#306  -  []  305.02 526.53 0 top
NOREF#307  -  []  376.15 537.62 90 top
NOREF#308  -  []  378.16 508.22 0 top
NOREF#309  -  []  218 227.33 0 top
NOREF#310  -  []  135.84 555.88 90 top
NOREF#311  -  []  442.66 526.53 0 top
NOREF#312  -  []  489.54 516.22 0 top
NOREF#313  -  []  425.51 527.93 0 top
NOREF#314  -  []  229.4 219.18 0 top
NOREF#315  -  []  311.65 508.22 90 top
NOREF#316  -  []  73.54 223.71 0 top
NOREF#317  -  []  545.75 509.97 90 top
NOREF#318  -  []  251.7 228.68 45 top
NOREF#319  -  []  111.13 560.45 90 top
NOREF#320  -  []  291.06 537.94 0 top
NOREF#321  -  []  99.84 214.4 90 top
NOREF#322  -  []  149.7 315.13 0 top
NOREF#323  -  []  31.02 216.85 90 top
NOREF#324  -  []  306.2 538.26 0 top
NOREF#325  -  []  296.68 537.94 0 top
NOREF#326  -  []  312.07 507.77 90 top
NOREF#327  -  []  89.44 215.4 90 top
NOREF#328  -  []  276.12 526.53 0 top
NOREF#329  -  []  365.36 508.22 0 top
NOREF#330  -  []  357.01 537.94 0 top
NOREF#331  -  []  339.75 508.22 0 top
NOREF#332  -  []  300.2 518.12 0 top
NOREF#333  -  []  49.1 217.17 0 top
NOREF#334  -  []  480.04 509.49 90 top
NOREF#335  -  []  353.91 516.22 0 top
NOREF#336  -  []  117.07 214.85 0 top
NOREF#337  -  []  633.12 537.94 0 top
NOREF#338  -  []  489.79 508.27 90 top
NOREF#339  -  []  38.64 212.41 0 top
NOREF#340  -  []  356.71 538.26 0 top
NOREF#341  -  []  113.71 170.01 90 top
NOREF#342  -  []  356.01 508.22 0 top
NOREF#343  -  []  453.63 506.32 90 top
NOREF#344  -  []  364.94 526.53 0 top
NOREF#345  -  []  19.62 259.79 90 top
NOREF#346  -  []  391.58 537.62 90 top
NOREF#347  -  []  307.22 526.53 0 top
NOREF#348  -  []  478.09 508.22 90 top
NOREF#349  -  []  51.64 212.09 0 top
NOREF#350  -  []  465.71 508.77 90 top
NOREF#351  -  []  631.72 537.94 0 top
NOREF#352  -  []  389.82 518.12 0 top
NOREF#353  -  []  520.25 521.72 0 top
NOREF#354  -  []  431.7 114.13 90 top
NOREF#355  -  []  90.36 222.85 0 top
NOREF#356  -  []  294.77 537.62 90 top
NOREF#357  -  []  360.92 538.26 0 top
NOREF#358  -  []  338.4 506.32 90 top
NOREF#359  -  []  44.35 203.51 90 top
NOREF#360  -  []  32.59 161.93 0 top
NOREF#361  -  []  299.48 537.94 0 top
NOREF#362  -  []  634.02 537.62 90 top
NOREF#363  -  []  269.86 521.93 90 top
NOREF#364  -  []  286.85 537.94 0 top
NOREF#365  -  []  109.5 171.54 90 top
NOREF#366  -  []  398.6 537.62 90 top
NOREF#367  -  []  72.61 216.26 90 top
NOREF#368  -  []  120.37 222.85 0 top
NOREF#369  -  []  355.1 537.62 90 top
NOREF#370  -  []  387.37 537.62 90 top
NOREF#371  -  []  441.63 509.49 90 top
NOREF#372  -  []  391.79 538.26 0 top
NOREF#373  -  []  456.33 516.22 0 top
NOREF#374  -  []  87.86 212.95 90 top
NOREF#375  -  []  120.37 222.85 0 top
NOREF#376  -  []  51.97 153.99 0 top
NOREF#377  -  []  32.29 162.25 0 top
NOREF#378  -  []  300.7 217.09 90 top
NOREF#379  -  []  272 218.53 90 top
NOREF#380  -  []  327.24 538.26 0 top
NOREF#381  -  []  393.85 526.53 0 top
NOREF#382  -  []  408.42 537.62 90 top
NOREF#383  -  []  49.43 146.36 90 top
NOREF#384  -  []  341.1 516.22 0 top
NOREF#385  -  []  456.96 523.33 90 top
NOREF#386  -  []  89.01 214.85 90 top
NOREF#387  -  []  323.34 537.94 0 top
NOREF#388  -  []  -3.74 556.52 0 top
NOREF#389  -  []  299.18 538.26 0 top
NOREF#390  -  []  460.47 526.53 0 top
NOREF#391  -  []  213.7 231.63 0 top
NOREF#392  -  []  39.91 161.6 90 top
NOREF#393  -  []  321.63 538.26 0 top
NOREF#394  -  []  45.43 258.4 90 top
NOREF#395  -  []  349.99 537.94 0 top
NOREF#396  -  []  362.86 508.22 90 top
NOREF#397  -  []  110.76 214.85 0 top
NOREF#398  -  []  302.7 516.22 0 top
NOREF#399  -  []  282.35 538.26 0 top
NOREF#400  -  []  394.39 537.62 90 top
NOREF#401  -  []  113.71 180.51 0 top
NOREF#402  -  []  288.26 537.94 0 top
NOREF#403  -  []  347.79 527.93 0 top
NOREF#404  -  []  46.26 212.41 0 top
NOREF#405  -  []  445.63 508.22 0 top
NOREF#406  -  []  0.77 556.2 0 top
NOREF#407  -  []  313.51 537.94 0 top
NOREF#408  -  []  282.14 537.62 90 top
NOREF#409  -  []  373.84 526.53 0 top
NOREF#410  -  []  115.04 215.4 90 top
NOREF#411  -  []  310.3 516.22 0 top
NOREF#412  -  []  50.12 240.78 0 top
NOREF#413  -  []  303.19 537.62 90 top
NOREF#414  -  []  401.61 538.26 0 top
NOREF#415  -  []  34.32 258.4 90 top
NOREF#416  -  []  293.92 526.53 0 top
NOREF#417  -  []  19.62 254.59 90 top
NOREF#418  -  []  94.68 174.32 0 top
NOREF#419  -  []  285.15 538.26 0 top
NOREF#420  -  []  328.7 233.63 0 top
NOREF#421  -  []  113.47 224.75 0 top
NOREF#422  -  []  630.01 538.26 0 top
NOREF#423  -  []  300.59 538.26 0 top
NOREF#424  -  []  105.61 569 0 top
NOREF#425  -  []  51.34 217.49 0 top
NOREF#426  -  []  359.82 537.94 0 top
NOREF#427  -  []  296.38 538.26 0 top
NOREF#428  -  []  108.08 195.83 0 top
NOREF#429  -  []  -2.34 556.52 0 top
NOREF#430  -  []  370.74 538.26 0 top
NOREF#431  -  []  51.34 212.41 0 top
NOREF#432  -  []  320.23 538.26 0 top
NOREF#433  -  []  104.1 174.74 0 top
NOREF#434  -  []  531.05 511.52 90 top
NOREF#435  -  []  480.59 508.22 0 top
NOREF#436  -  []  32.29 161.6 90 top
NOREF#437  -  []  392.09 537.94 0 top
NOREF#438  -  []  396.62 508.22 0 top
NOREF#439  -  []  258 227.33 0 top
NOREF#440  -  []  365.13 538.26 0 top
NOREF#441  -  []  542.05 506.32 90 top
NOREF#442  -  []  423.66 526.53 0 top
NOREF#443  -  []  58.96 216.85 90 top
NOREF#444  -  []  351.41 518.12 0 top
NOREF#445  -  []  46.68 263 0 top
NOREF#446  -  []  312.11 537.94 0 top
NOREF#447  -  []  105.5 192.08 90 top
NOREF#448  -  []  347.79 527.93 0 top
NOREF#449  -  []  307.4 537.62 90 top
NOREF#450  -  []  349.69 538.26 0 top
NOREF#451  -  []  409.35 526.53 0 top
NOREF#452  -  []  235.72 204.55 0 top
NOREF#453  -  []  111.53 195.27 0 top
NOREF#454  -  []  302.7 516.22 0 top
NOREF#455  -  []  322.83 537.62 90 top
NOREF#456  -  []  96.65 195.83 0 top
NOREF#457  -  []  469.14 516.22 0 top
NOREF#458  -  []  449.36 526.53 0 top
NOREF#459  -  []  77.94 223.71 0 top
NOREF#460  -  []  291.7 228.68 45 top
NOREF#461  -  []  46.68 263 0 top
NOREF#462  -  []  -0.93 556.52 0 top
NOREF#463  -  []  281.17 527.93 0 top
NOREF#464  -  []  376.04 526.53 0 top
NOREF#465  -  []  395.7 176.63 90 top
NOREF#466  -  []  90.28 174.32 0 top
NOREF#467  -  []  71.04 213.81 90 top
NOREF#468  -  []  380.86 537.94 0 top
NOREF#469  -  []  403.1 521.93 90 top
NOREF#470  -  []  366.71 516.22 0 top
NOREF#471  -  []  363.28 508.77 90 top
NOREF#472  -  []  447.71 527.93 0 top
NOREF#473  -  []  385.97 537.62 90 top
NOREF#474  -  []  434.76 526.53 0 top
NOREF#475  -  []  403.31 537.94 0 top
NOREF#476  -  []  107.56 222.85 0 top
NOREF#477  -  []  313.21 538.26 0 top
NOREF#478  -  []  394.59 538.26 0 top
NOREF#479  -  []  534.74 509.97 90 top
NOREF#480  -  []  377.62 509.49 90 top
NOREF#481  -  []  48.8 178.75 90 top
NOREF#482  -  []  332.29 558.5 90 top
NOREF#483  -  []  387.15 526.53 0 top
NOREF#484  -  []  397.7 537.94 0 top
NOREF#485  -  []  345.93 523.33 90 top
NOREF#486  -  []  469.92 527.93 0 top
NOREF#487  -  []  114.19 178.56 0 top
NOREF#488  -  []  305.99 537.62 90 top
NOREF#489  -  []  349.44 526.53 0 top
NOREF#490  -  []  424.06 538.26 0 top
NOREF#491  -  []  98.72 560.45 90 top
NOREF#492  -  []  253.91 526.53 0 top
NOREF#493  -  []  381.61 508.22 0 top
NOREF#494  -  []  327.7 197.63 90 top
NOREF#495  -  []  298.98 537.62 90 top
NOREF#496  -  []  293.57 538.26 0 top
NOREF#497  -  []  338.33 526.53 0 top
NOREF#498  -  []  49.73 203.84 0 top
NOREF#499  -  []  44.65 203.84 0 top
NOREF#500  -  []  452.9 507.77 90 top
NOREF#501  -  []  134.94 556.2 0 top
NOREF#502  -  []  324.87 507.77 90 top
NOREF#503  -  []  327.23 526.53 0 top
NOREF#504  -  []  365.43 537.94 0 top
NOREF#505  -  []  292.07 521.93 90 top
NOREF#506  -  []  97.88 171.12 90 top
NOREF#507  -  []  351.1 538.26 0 top
NOREF#508  -  []  368.81 516.22 0 top
NOREF#509  -  []  390.35 523.33 90 top
NOREF#510  -  []  390.68 537.94 0 top
NOREF#511  -  []  468.07 523.33 90 top
NOREF#512  -  []  -1.14 555.88 90 top
NOREF#513  -  []  453.76 526.53 0 top
NOREF#514  -  []  310.55 508.27 90 top
NOREF#515  -  []  87.86 224.75 0 top
NOREF#516  -  []  83.01 215.26 90 top
NOREF#517  -  []  392.2 527.93 0 top
NOREF#518  -  []  289.36 538.26 0 top
NOREF#519  -  []  386.47 537.94 0 top
NOREF#520  -  []  98.31 214.9 90 top
NOREF#521  -  []  301.79 537.62 90 top
NOREF#522  -  []  392.2 527.93 0 top
NOREF#523  -  []  369.13 537.62 90 top
NOREF#524  -  []  46.89 187 90 top
NOREF#525  -  []  247.86 527.93 0 top
NOREF#526  -  []  323.7 204.63 90 top
NOREF#527  -  []  404.95 526.53 0 top
NOREF#528  -  []  53.88 211.77 90 top
NOREF#529  -  []  550.66 508.32 90 top
NOREF#530  -  []  469.14 516.22 0 top
NOREF#531  -  []  74.64 215.71 0 top
NOREF#532  -  []  43.72 212.41 0 top
NOREF#533  -  []  379.51 516.22 0 top
NOREF#534  -  []  383.81 508.22 0 top
NOREF#535  -  []  289.66 537.94 0 top
NOREF#536  -  []  361.76 508.27 90 top
NOREF#537  -  []  371.64 526.53 0 top
NOREF#538  -  []  427.16 526.53 0 top
NOREF#539  -  []  258.96 527.93 0 top
NOREF#540  -  []  436.61 527.93 0 top
NOREF#541  -  []  358.89 527.93 0 top
NOREF#542  -  []  301.99 538.26 0 top
NOREF#543  -  []  388.78 537.62 90 top
NOREF#544  -  []  393.19 538.26 0 top
NOREF#545  -  []  469.72 521.93 90 top
NOREF#546  -  []  632.82 538.26 0 top
NOREF#547  -  []  401.45 526.53 0 top
NOREF#548  -  []  347.19 537.94 0 top
NOREF#549  -  []  368.14 526.53 0 top
NOREF#550  -  []  333.7 231.63 0 top
NOREF#551  -  []  232 218.53 90 top
NOREF#552  -  []  522.65 519.72 0 top
NOREF#553  -  []  315.82 537.62 90 top
NOREF#554  -  []  270.06 527.93 0 top
NOREF#555  -  []  298.08 537.94 0 top
NOREF#556  -  []  534.75 518.07 0 top
NOREF#557  -  []  389.28 537.94 0 top
NOREF#558  -  []  310.2 537.62 90 top
NOREF#559  -  []  298.32 526.53 0 top
NOREF#560  -  []  402.42 506.32 90 top
NOREF#561  -  []  116.71 171.45 90 top
NOREF#562  -  []  41.18 211.77 90 top
NOREF#563  -  []  539.65 508.32 90 top
NOREF#564  -  []  336.15 508.27 90 top
NOREF#565  -  []  185.7 252.63 0 top
NOREF#566  -  []  309 538.26 0 top
NOREF#567  -  []  412.55 523.33 90 top
NOREF#568  -  []  465.28 508.22 90 top
NOREF#569  -  []  44.02 179.07 0 top
NOREF#570  -  []  287.22 526.53 0 top
NOREF#571  -  []  376.81 506.32 90 top
NOREF#572  -  []  281.17 527.93 0 top
NOREF#573  -  []  211.7 228.68 45 top
NOREF#574  -  []  441.03 518.12 0 top
NOREF#575  -  []  19.62 269.99 0 top
NOREF#576  -  []  96.65 190.68 90 top
NOREF#577  -  []  303.69 537.94 0 top
NOREF#578  -  []  101.9 174.74 0 top
NOREF#579  -  []  294.97 538.26 0 top
NOREF#580  -  []  309.3 537.94 0 top
NOREF#581  -  []  44.47 241.33 0 top
NOREF#582  -  []  285.02 526.53 0 top
NOREF#583  -  []  283.55 537.62 90 top
NOREF#584  -  []  90.28 174.32 0 top
NOREF#585  -  []  232 210.08 90 top
NOREF#586  -  []  71.74 216.98 90 top
NOREF#587  -  []  268.21 523.33 90 top
NOREF#588  -  []  303.37 527.93 0 top
NOREF#589  -  []  377.55 537.62 90 top
NOREF#590  -  []  291.96 537.62 90 top
NOREF#591  -  []  0.27 555.88 90 top
NOREF#592  -  []  407.15 526.53 0 top
NOREF#593  -  []  464.18 508.27 90 top
NOREF#594  -  []  352 210.08 90 top
NOREF#595  -  []  348.2 279.63 0 top
NOREF#596  -  []  39.97 263 0 top
NOREF#597  -  []  436.61 527.93 0 top
NOREF#598  -  []  275.72 204.55 0 top
NOREF#599  -  []  348.7 516.22 0 top
NOREF#600  -  []  368.81 508.22 0 top
NOREF#601  -  []  486.24 508.22 0 top
NOREF#602  -  []  324.87 508.77 90 top
NOREF#603  -  []  334.26 538.26 0 top
NOREF#604  -  []  100.65 175.29 0 top
NOREF#605  -  []  531.05 506.32 90 top
NOREF#606  -  []  471.57 526.53 0 top
NOREF#607  -  []  304.59 537.62 90 top
NOREF#608  -  []  479.24 506.32 90 top
NOREF#609  -  []  268.21 526.53 0 top
NOREF#610  -  []  89.03 174.87 0 top
NOREF#611  -  []  271.71 526.53 0 top
NOREF#612  -  []  337.68 508.77 90 top
NOREF#613  -  []  337.68 507.77 90 top
NOREF#614  -  []  354.2 537.94 0 top
NOREF#615  -  []  401.69 507.77 90 top
NOREF#616  -  []  445.63 516.22 0 top
NOREF#617  -  []  366.71 516.22 0 top
NOREF#618  -  []  403.3 527.93 0 top
NOREF#619  -  []  370.54 537.62 90 top
NOREF#620  -  []  211.7 233.63 0 top
NOREF#621  -  []  53.32 237.58 90 top
NOREF#622  -  []  312 218.53 90 top
NOREF#623  -  []  260.7 217.09 90 top
NOREF#624  -  []  296.17 537.62 90 top
NOREF#625  -  []  484.04 516.22 0 top
NOREF#626  -  []  454.44 509.49 90 top
NOREF#627  -  []  283.7 224.63 0 top
NOREF#628  -  []  456.33 516.22 0 top
NOREF#629  -  []  286.35 537.62 90 top
NOREF#630  -  []  350.48 507.77 90 top
NOREF#631  -  []  292.7 195.63 90 top
NOREF#632  -  []  351.4 537.94 0 top
NOREF#633  -  []  109.9 174.74 0 top
NOREF#634  -  []  319.13 537.94 0 top
NOREF#635  -  []  440.46 526.53 0 top
NOREF#636  -  []  104.92 560.45 90 top
NOREF#637  -  []  98.28 174.32 0 top
NOREF#638  -  []  353.9 538.26 0 top
NOREF#639  -  []  458.82 527.93 0 top
NOREF#640  -  []  300.89 537.94 0 top
NOREF#641  -  []  285.45 537.94 0 top
NOREF#642  -  []  35.57 263 0 top
NOREF#643  -  []  309.42 526.53 0 top
NOREF#644  -  []  404.71 537.94 0 top
NOREF#645  -  []  479.17 523.33 90 top
NOREF#646  -  []  456.96 526.53 0 top
NOREF#647  -  []  113.73 195.27 0 top
NOREF#648  -  []  349.49 537.62 90 top
NOREF#649  -  []  46.26 217.49 0 top
NOREF#650  -  []  371.01 508.22 0 top
NOREF#651  -  []  360.54 526.53 0 top
NOREF#652  -  []  371.04 537.94 0 top
NOREF#653  -  []  367.93 538.26 0 top
NOREF#654  -  []  41.81 187 90 top
NOREF#655  -  []  320.53 537.94 0 top
NOREF#656  -  []  293.92 526.53 0 top
NOREF#657  -  []  491.31 507.77 90 top
NOREF#658  -  []  269.4 219.18 0 top
NOREF#659  -  []  313.01 537.62 90 top
NOREF#660  -  []  270.06 527.93 0 top
NOREF#661  -  []  105.36 222.85 0 top
NOREF#662  -  []  389.89 204.16 90 top
NOREF#663  -  []  304.8 508.22 0 top
NOREF#664  -  []  376.09 507.77 90 top
NOREF#665  -  []  346.68 537.62 90 top
NOREF#666  -  []  492.04 506.32 90 top
NOREF#667  -  []  369.64 537.94 0 top
NOREF#668  -  []  405.82 538.26 0 top
NOREF#669  -  []  310.71 537.94 0 top
NOREF#670  -  []  315.5 516.22 0 top
NOREF#671  -  []  631.42 538.26 0 top
NOREF#672  -  []  118.17 222.85 0 top
NOREF#673  -  []  412.55 526.53 0 top
NOREF#674  -  []  334.56 537.94 0 top
NOREF#675  -  []  371.64 526.53 0 top
NOREF#676  -  []  205.73 558.75 90 top
NOREF#677  -  []  46.56 212.09 0 top
NOREF#678  -  []  471.24 516.22 0 top
NOREF#679  -  []  43.72 179.39 0 top
NOREF#680  -  []  93.66 214.85 0 top
NOREF#681  -  []  51.34 171.14 0 top
NOREF#682  -  []  400.51 537.94 0 top
NOREF#683  -  []  318.33 526.53 0 top
NOREF#684  -  []  105.9 195.27 0 top
NOREF#685  -  []  388.89 507.77 90 top
NOREF#686  -  []  292.27 527.93 0 top
NOREF#687  -  []  390.35 526.53 0 top
NOREF#688  -  []  401.41 537.62 90 top
NOREF#689  -  []  46.56 217.17 0 top
NOREF#690  -  []  532.85 519.22 0 top
NOREF#691  -  []  481.94 516.22 0 top
NOREF#692  -  []  444.29 537.62 90 top
NOREF#693  -  []  329.39 560.22 0 top
NOREF#694  -  []  377.76 538.26 0 top
NOREF#695  -  []  45.72 240.78 0 top
NOREF#696  -  []  317.42 538.26 0 top
NOREF#697  -  []  336.48 521.93 90 top
NOREF#698  -  []  481.94 516.22 0 top
NOREF#699  -  []  334.83 523.33 90 top
NOREF#700  -  []  297.58 537.62 90 top
NOREF#701  -  []  288.7 233.63 0 top
NOREF#702  -  []  425.26 537.62 90 top
NOREF#703  -  []  359.31 537.62 90 top
NOREF#704  -  []  249.51 526.53 0 top
NOREF#705  -  []  33.56 216.85 90 top
NOREF#706  -  []  401.7 170.63 90 top
NOREF#707  -  []  381.1 527.93 0 top
NOREF#708  -  []  379.24 526.53 0 top
NOREF#709  -  []  401.91 537.94 0 top
NOREF#710  -  []  31.32 217.17 0 top
NOREF#711  -  []  355.72 204.55 0 top
NOREF#712  -  []  45.43 263.55 0 top
NOREF#713  -  []  399.92 516.22 0 top
NOREF#714  -  []  392.99 537.62 90 top
NOREF#715  -  []  88.56 216.12 90 top
NOREF#716  -  []  306.5 537.94 0 top
NOREF#717  -  []  451.13 516.22 0 top
NOREF#718  -  []  528.65 508.32 90 top
NOREF#719  -  []  303.17 521.93 90 top
NOREF#720  -  []  47.92 240.78 0 top
NOREF#721  -  []  352.56 508.22 0 top
NOREF#722  -  []  92.48 174.32 0 top
NOREF#723  -  []  307.9 537.94 0 top
NOREF#724  -  []  309.4 219.18 0 top
NOREF#725  -  []  364.21 518.12 0 top
NOREF#726  -  []  463.93 516.22 0 top
NOREF#727  -  []  396.05 526.53 0 top
NOREF#728  -  []  31.02 217.49 0 top
NOREF#729  -  []  338 227.33 0 top
NOREF#730  -  []  336.86 537.62 90 top
NOREF#731  -  []  51.34 170.49 90 top
NOREF#732  -  []  44.65 153.67 0 top
NOREF#733  -  []  316.13 526.53 0 top
NOREF#734  -  []  100.65 170.14 90 top
NOREF#735  -  []  72.19 223.71 0 top
NOREF#736  -  []  316.32 537.94 0 top
NOREF#737  -  []  420.46 526.53 0 top
NOREF#738  -  []  368.14 523.33 90 top
NOREF#739  -  []  466.43 506.32 90 top
NOREF#740  -  []  53.88 216.85 90 top
NOREF#741  -  []  44.02 212.09 0 top
NOREF#742  -  []  362.32 538.26 0 top
NOREF#743  -  []  328.3 516.22 0 top
NOREF#744  -  []  101.37 216.12 90 top
NOREF#745  -  []  357.04 526.53 0 top
NOREF#746  -  []  40.21 161.93 0 top
NOREF#747  -  []  48.8 216.85 90 top
NOREF#748  -  []  392.32 516.22 0 top
NOREF#749  -  []  311.61 537.62 90 top
NOREF#750  -  []  101.9 174.74 0 top
NOREF#751  -  []  363.72 538.26 0 top
NOREF#752  -  []  361.51 516.22 0 top
NOREF#753  -  []  456.33 516.22 0 top
NOREF#754  -  []  382.27 537.94 0 top
NOREF#755  -  []  314.48 527.93 0 top
NOREF#756  -  []  632.61 537.62 90 top
NOREF#757  -  []  105.4 558.5 90 top
NOREF#758  -  []  358.21 508.22 0 top
NOREF#759  -  []  44.35 147.01 0 top
NOREF#760  -  []  462.67 526.53 0 top
NOREF#761  -  []  101.81 222.85 0 top
NOREF#762  -  []  280.94 538.26 0 top
NOREF#763  -  []  469.92 527.93 0 top
NOREF#764  -  []  378.06 537.94 0 top
NOREF#765  -  []  414.2 521.93 90 top
NOREF#766  -  []  54.68 263 0 top
NOREF#767  -  []  416.06 526.53 0 top
NOREF#768  -  []  330.4 516.22 0 top
NOREF#769  -  []  203.7 224.63 0 top
NOREF#770  -  []  37.77 263 0 top
NOREF#771  -  []  220.7 217.09 90 top
NOREF#772  -  []  479.17 526.53 0 top
NOREF#773  -  []  377.01 518.12 0 top
NOREF#774  -  []  -0.63 556.2 0 top
NOREF#775  -  []  94.76 222.85 0 top
NOREF#776  -  []  325.38 521.93 90 top
NOREF#777  -  []  399.1 537.94 0 top
NOREF#778  -  []  54.28 259.8 90 top
NOREF#779  -  []  521.85 519.22 0 top
NOREF#780  -  []  303.37 527.93 0 top
NOREF#781  -  []  379.16 538.26 0 top
NOREF#782  -  []  443.53 516.22 0 top
NOREF#783  -  []  96.2 559.94 90 top
NOREF#784  -  []  364.81 509.49 90 top
NOREF#785  -  []  253.7 231.63 0 top
NOREF#786  -  []  345.48 538.26 0 top
NOREF#787  -  []  58.96 217.49 0 top
NOREF#788  -  []  100.1 195.27 0 top
NOREF#789  -  []  -3.44 556.2 0 top
NOREF#790  -  []  357.91 537.62 90 top
NOREF#791  -  []  358.11 538.26 0 top
NOREF#792  -  []  635.42 537.62 90 top
NOREF#793  -  []  304.8 516.22 0 top
NOREF#794  -  []  292.47 537.94 0 top
NOREF#795  -  []  335.66 538.26 0 top
NOREF#796  -  []  330.4 508.22 0 top
NOREF#797  -  []  49.43 204.16 0 top
NOREF#798  -  []  331.59 558.77 90 top
NOREF#799  -  []  395.79 537.62 90 top
NOREF#800  -  []  252.7 195.63 90 top
NOREF#801  -  []  39.91 195.26 90 top
NOREF#802  -  []  412.53 273.64 0 top
NOREF#803  -  []  332.6 508.22 0 top
NOREF#804  -  []  312.62 526.53 0 top
NOREF#805  -  []  315.72 204.55 0 top
NOREF#806  -  []  445.86 523.33 90 top
NOREF#807  -  []  337.25 508.22 90 top
NOREF#808  -  []  407.52 537.94 0 top
NOREF#809  -  []  334.83 526.53 0 top
NOREF#810  -  []  287.7 197.63 90 top
NOREF#811  -  []  104.26 214.85 0 top
NOREF#812  -  []  328.3 516.22 0 top
NOREF#813  -  []  473.77 526.53 0 top
NOREF#814  -  []  540.45 508.82 90 top
NOREF#815  -  []  416.06 526.53 0 top
NOREF#816  -  []  343.2 508.22 0 top
NOREF#817  -  []  347.58 521.93 90 top
NOREF#818  -  []  269.4 219.18 0 top
NOREF#819  -  []  438.26 526.53 0 top
NOREF#820  -  []  345.78 537.94 0 top
NOREF#821  -  []  338.6 518.12 0 top
NOREF#822  -  []  43.17 259.8 90 top
NOREF#823  -  []  314.15 508.22 0 top
NOREF#824  -  []  297.78 538.26 0 top
NOREF#825  -  []  249.51 526.53 0 top
NOREF#826  -  []  414.41 527.93 0 top
NOREF#827  -  []  292.27 527.93 0 top
NOREF#828  -  []  331.7 233.63 0 top
NOREF#829  -  []  478.51 507.77 90 top
NOREF#830  -  []  352.5 538.26 0 top
NOREF#831  -  []  295.27 537.94 0 top
NOREF#832  -  []  376.65 537.94 0 top
NOREF#833  -  []  336.68 527.93 0 top
NOREF#834  -  []  379.51 516.22 0 top
NOREF#835  -  []  72.19 215.71 90 top
NOREF#836  -  []  436.41 521.93 90 top
NOREF#837  -  []  369.99 527.93 0 top
NOREF#838  -  []  338.33 526.53 0 top
NOREF#839  -  []  316.02 538.26 0 top
NOREF#840  -  []  114.19 171.96 90 top
NOREF#841  -  []  388.89 508.77 90 top
NOREF#842  -  []  349.4 219.18 0 top
NOREF#843  -  []  453.83 518.12 0 top
NOREF#844  -  []  374.95 538.26 0 top
NOREF#845  -  []  44.99 195.9 0 top
NOREF#846  -  []  208.7 233.63 0 top
NOREF#847  -  []  349.44 526.53 0 top
NOREF#848  -  []  363.28 507.77 90 top
NOREF#849  -  []  1.67 555.88 90 top
NOREF#850  -  []  473.44 508.22 0 top
NOREF#851  -  []  305.09 537.94 0 top
NOREF#852  -  []  372.14 538.26 0 top
NOREF#853  -  []  340.53 526.53 0 top
NOREF#854  -  []  300.38 537.62 90 top
NOREF#855  -  []  51.34 211.77 90 top
NOREF#856  -  []  100.66 212.95 90 top
NOREF#857  -  []  384.95 526.53 0 top
NOREF#858  -  []  443.09 538.26 0 top
NOREF#859  -  []  51.34 216.85 90 top
NOREF#860  -  []  443.53 516.22 0 top
NOREF#861  -  []  454.98 508.22 0 top
NOREF#862  -  []  362.12 537.62 90 top
NOREF#863  -  []  442.18 508.22 0 top
NOREF#864  -  []  243.4 201.93 90 top
NOREF#865  -  []  56.42 217.49 0 top
NOREF#866  -  []  53.88 217.49 0 top
NOREF#867  -  []  315.5 516.22 0 top
NOREF#868  -  []  101.81 214.85 90 top
NOREF#869  -  []  229.4 219.18 0 top
NOREF#870  -  []  112.64 214.4 90 top
NOREF#871  -  []  367.7 197.63 90 top
NOREF#872  -  []  114.62 222.85 0 top
NOREF#873  -  []  40.21 195.58 0 top
NOREF#874  -  []  378.96 537.62 90 top
NOREF#875  -  []  445.86 526.53 0 top
NOREF#876  -  []  100.65 175.29 0 top
NOREF#877  -  []  283.4 201.93 90 top
NOREF#878  -  []  46.89 187.65 0 top
NOREF#879  -  []  381.61 516.22 0 top
NOREF#880  -  []  349.14 227.66 0 top
NOREF#881  -  []  44.93 555.88 90 top
NOREF#882  -  []  543.86 519.22 0 top
NOREF#883  -  []  491.31 508.77 90 top
NOREF#884  -  []  325.58 527.93 0 top
NOREF#885  -  []  22.02 256.59 90 top
NOREF#886  -  []  108.08 195.83 0 top
NOREF#887  -  []  348.95 508.27 90 top
NOREF#888  -  []  290.42 526.53 0 top
NOREF#889  -  []  478.51 508.77 90 top
NOREF#890  -  []  53.88 212.41 0 top
NOREF#891  -  []  99.2 558.5 90 top
NOREF#892  -  []  323.7 224.63 0 top
NOREF#893  -  []  392.32 516.22 0 top
NOREF#894  -  []  94.76 222.85 0 top
NOREF#895  -  []  360.7 144.63 90 top
NOREF#896  -  []  108.08 190.68 90 top
NOREF#897  -  []  444.79 537.94 0 top
NOREF#898  -  []  385.07 537.94 0 top
NOREF#899  -  []  531.25 521.72 0 top
NOREF#900  -  []  313 518.12 0 top
NOREF#901  -  []  352.3 537.62 90 top
NOREF#902  -  []  212.14 558.75 90 top
NOREF#903  -  []  314.92 537.94 0 top
NOREF#904  -  []  284.05 537.94 0 top
NOREF#905  -  []  335.9 516.22 0 top
NOREF#906  -  []  247.86 527.93 0 top
NOREF#907  -  []  366.83 537.94 0 top
NOREF#908  -  []  41.81 187.65 0 top
NOREF#909  -  []  390.18 537.62 90 top
NOREF#910  -  []  630.31 537.94 0 top
NOREF#911  -  []  47.19 187.32 0 top
NOREF#912  -  []  324.24 537.62 90 top
NOREF#913  -  []  437.7 108.13 90 top
NOREF#914  -  []  443.53 516.22 0 top
NOREF#915  -  []  379.51 516.22 0 top
NOREF#916  -  []  373.85 537.94 0 top
NOREF#917  -  []  317.6 508.22 0 top
NOREF#918  -  []  353.91 516.22 0 top
NOREF#919  -  []  381.1 527.93 0 top
NOREF#920  -  []  113.47 212.95 90 top
NOREF#921  -  []  273.91 526.53 0 top
NOREF#922  -  []  76.84 215.71 0 top
NOREF#923  -  []  89.03 174.87 0 top
NOREF#924  -  []  265.01 526.53 0 top
NOREF#925  -  []  117.33 195.27 0 top
NOREF#926  -  []  363.52 537.62 90 top
NOREF#927  -  []  106.09 567.05 0 top
NOREF#928  -  []  310.41 538.26 0 top
NOREF#929  -  []  0.47 556.52 0 top
NOREF#930  -  []  302.7 516.22 0 top
NOREF#931  -  []  323.35 508.27 90 top
NOREF#932  -  []  400 537.62 90 top
NOREF#933  -  []  123.92 214.9 90 top
NOREF#934  -  []  357.04 523.33 90 top
NOREF#935  -  []  392.32 516.22 0 top
NOREF#936  -  []  407.22 538.26 0 top
NOREF#937  -  []  179.7 258.63 0 top
NOREF#938  -  []  414.41 527.93 0 top
NOREF#939  -  []  45.72 240.78 0 top
NOREF#940  -  []  364.92 537.62 90 top
NOREF#941  -  []  81.14 215.71 0 top
NOREF#942  -  []  43.72 211.77 90 top
NOREF#943  -  []  394.42 508.22 0 top
NOREF#944  -  []  54.18 212.09 0 top
NOREF#945  -  []  545.76 518.07 0 top
NOREF#946  -  []  476.74 516.22 0 top
NOREF#947  -  []  445.69 537.62 90 top
NOREF#948  -  []  434.76 523.33 90 top
NOREF#949  -  []  44.99 195.26 90 top
NOREF#950  -  []  305.02 526.53 0 top
NOREF#951  -  []  356.01 516.22 0 top
NOREF#952  -  []  447.83 508.22 0 top
NOREF#953  -  []  115.97 222.85 0 top
NOREF#954  -  []  284.95 537.62 90 top
NOREF#955  -  []  26.93 258.24 90 top
NOREF#956  -  []  364.02 537.94 0 top
NOREF#957  -  []  335.96 537.94 0 top
NOREF#958  -  []  286.55 538.26 0 top
NOREF#959  -  []  392 521.93 90 top
NOREF#960  -  []  388.46 508.22 90 top
NOREF#961  -  []  350.05 508.22 90 top
NOREF#962  -  []  381.76 537.62 90 top
NOREF#963  -  []  326.95 508.22 0 top
NOREF#964  -  []  309.4 219.18 0 top
NOREF#965  -  []  46.56 170.81 0 top
NOREF#966  -  []  358.89 527.93 0 top
NOREF#967  -  []  312.07 508.77 90 top
NOREF#968  -  []  359.52 538.26 0 top
NOREF#969  -  []  33.86 217.17 0 top
NOREF#970  -  []  424.36 537.94 0 top
NOREF#971  -  []  631.21 537.62 90 top
NOREF#972  -  []  301.52 523.33 90 top
NOREF#973  -  []  467.79 508.22 0 top
NOREF#974  -  []  401.69 508.77 90 top
NOREF#975  -  []  403.01 538.26 0 top
NOREF#976  -  []  56.42 216.85 90 top
NOREF#977  -  []  97.9 195.27 0 top
NOREF#978  -  []  400.17 508.27 90 top
NOREF#979  -  []  551.46 508.82 90 top
NOREF#980  -  []  303.39 538.26 0 top
NOREF#981  -  []  362.74 526.53 0 top
NOREF#982  -  []  335.46 537.62 90 top
NOREF#983  -  []  405.61 537.62 90 top
NOREF#984  -  []  89.03 169.72 90 top
NOREF#985  -  []  400.21 538.26 0 top
NOREF#986  -  []  48.8 217.49 0 top
NOREF#987  -  []  362.62 537.94 0 top
NOREF#988  -  []  323.4 201.93 90 top
NOREF#989  -  []  108.61 559.94 90 top
NOREF#990  -  []  372.7 195.63 90 top
